# Altium PCB PWB.PcbDoc (part 1 of 5)
Units mm, origin at the board's own origin, x right, y up, seen from the top; angles counter-clockwise.
Board outline 202 x 125 mm, 2 copper layers (Top Layer, Bottom Layer), stack 1.576 mm thick; 208 components, 124 nets, 630 pads, 5440 vias.
Unrouted connection lines stored in the file: 98.
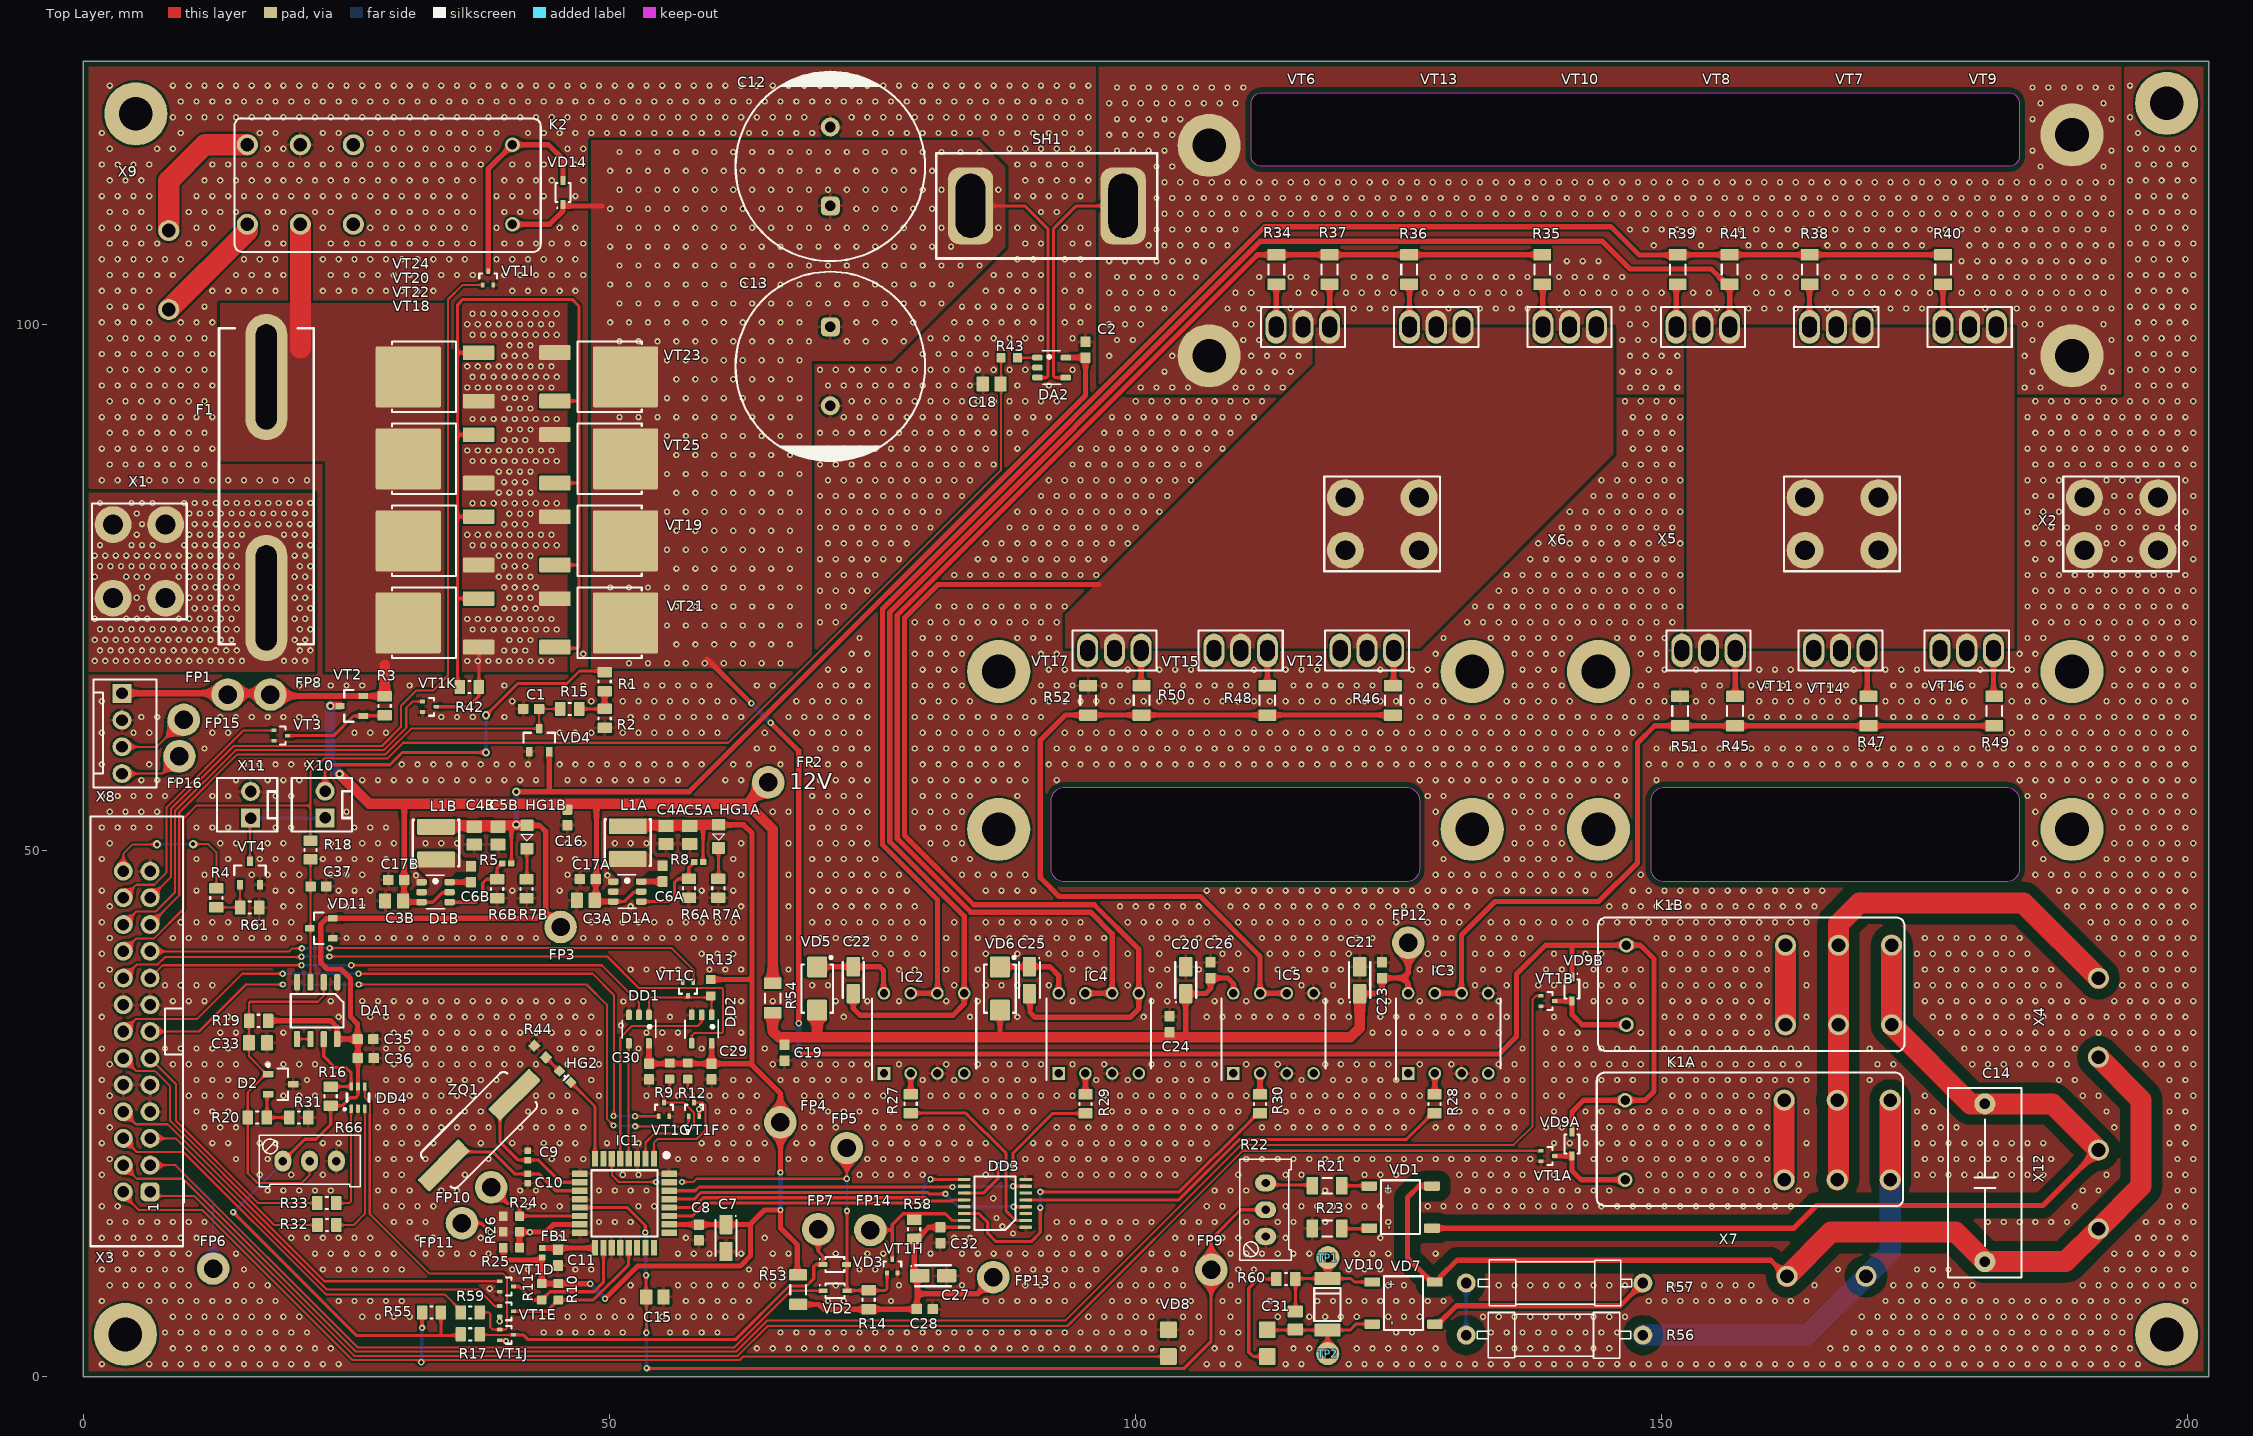
[diagram p0: Top Layer view]
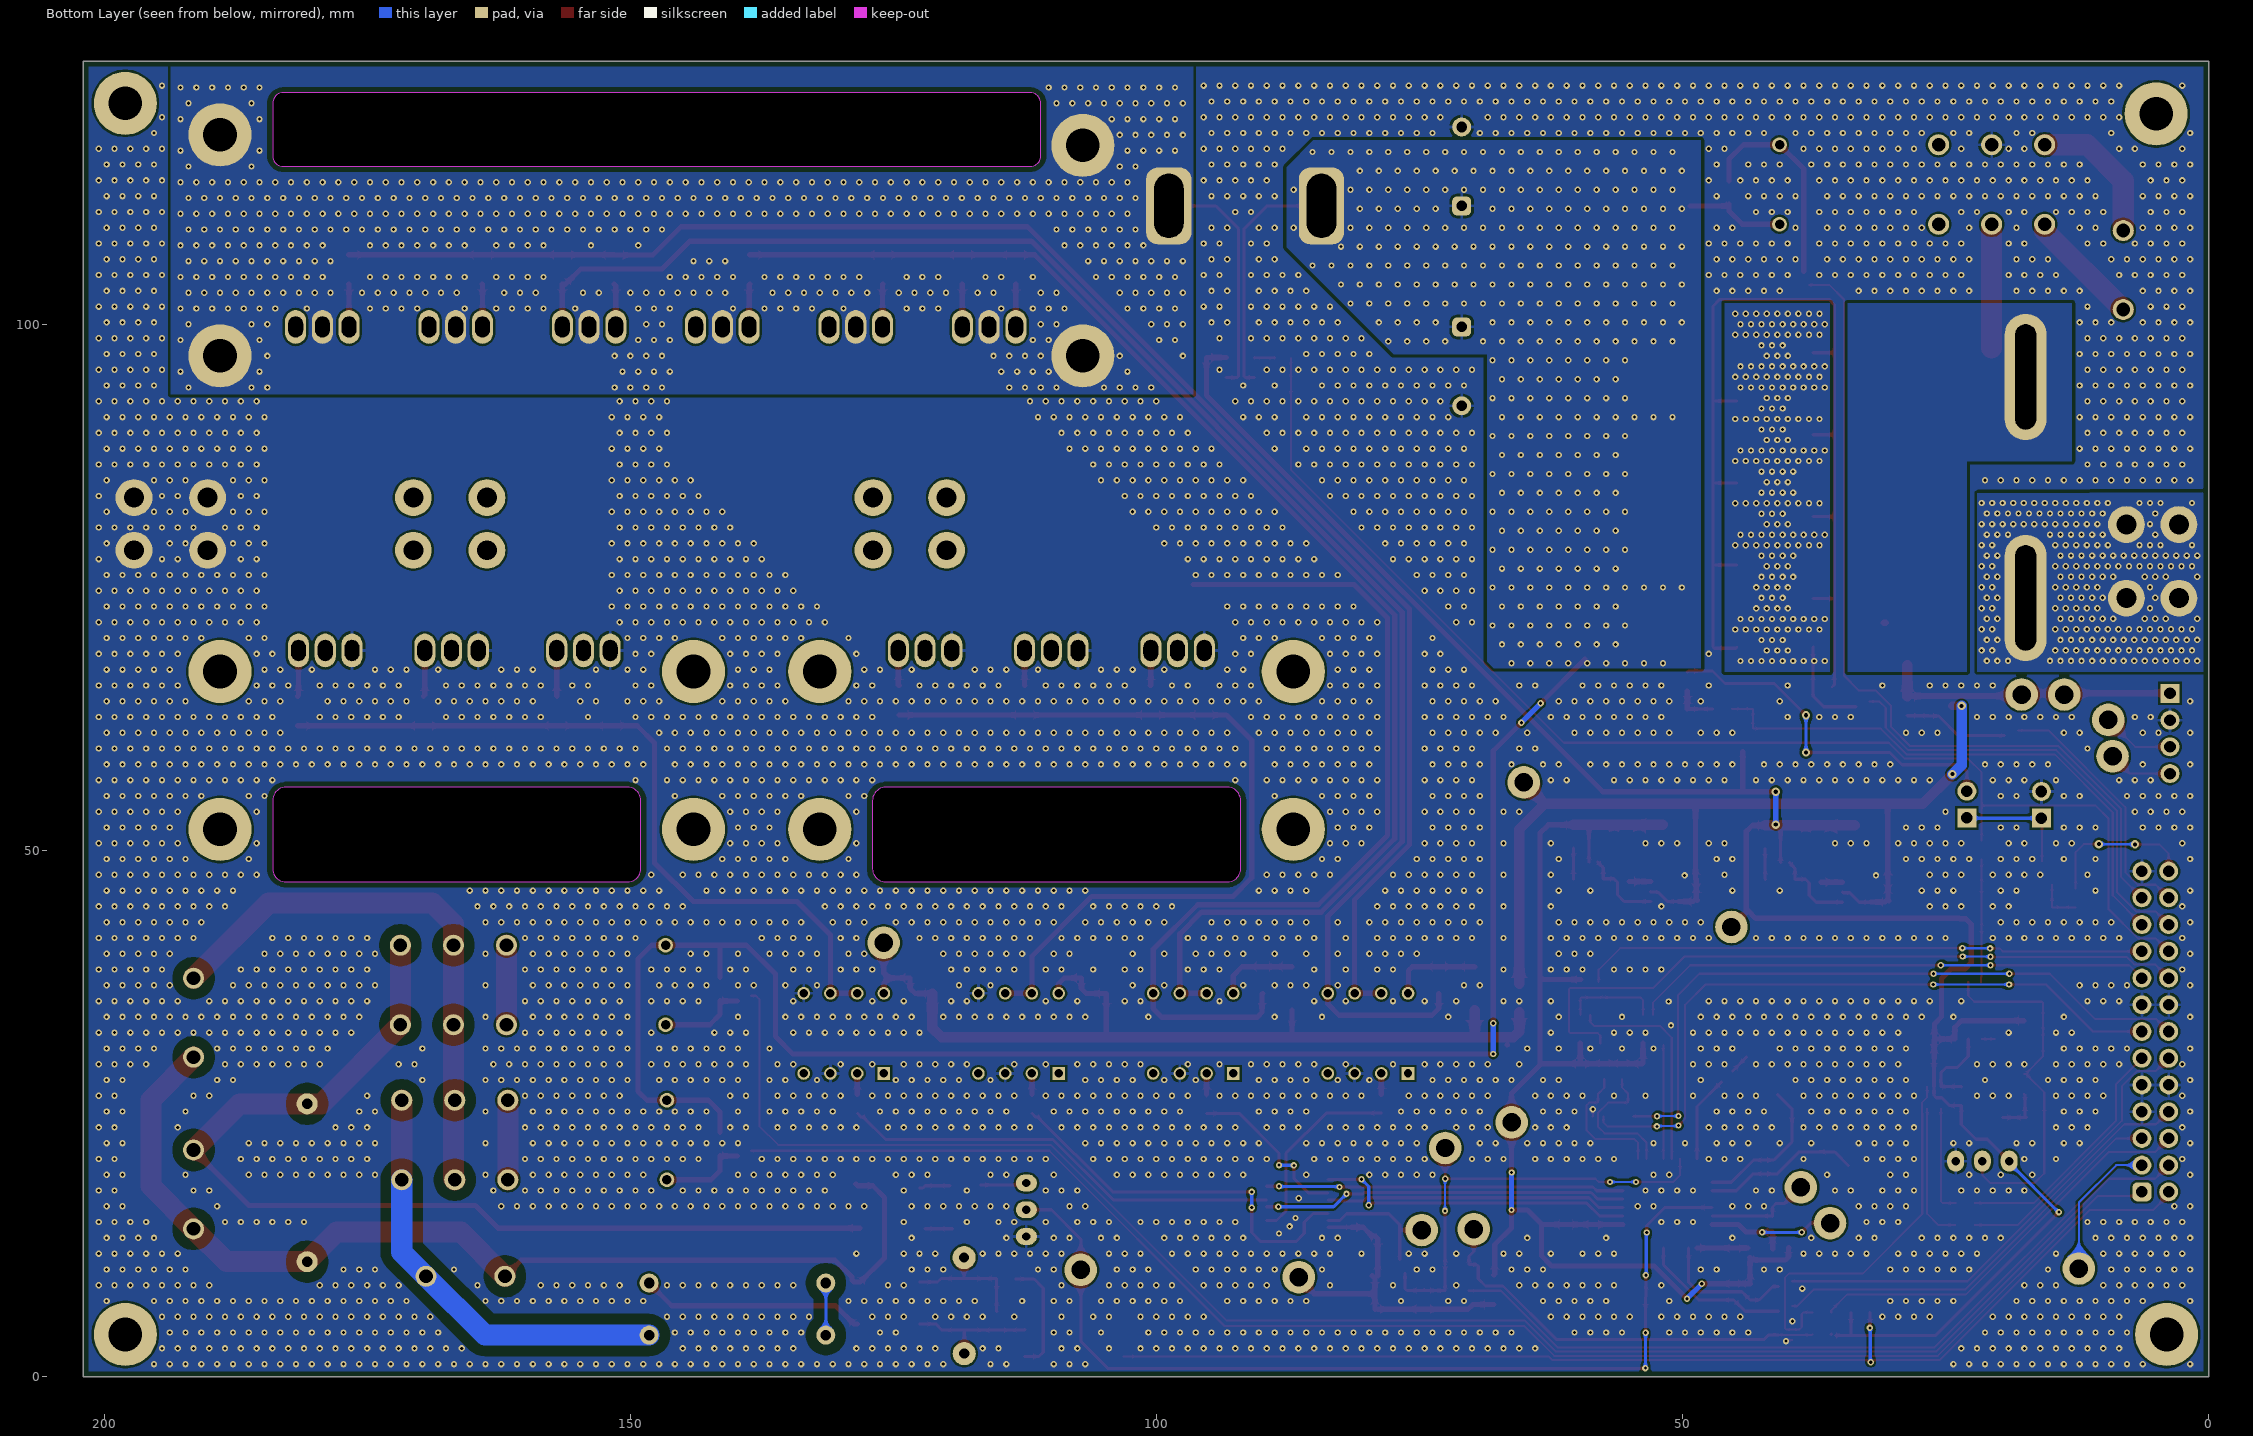
[diagram p1: Bottom Layer view, seen from below]
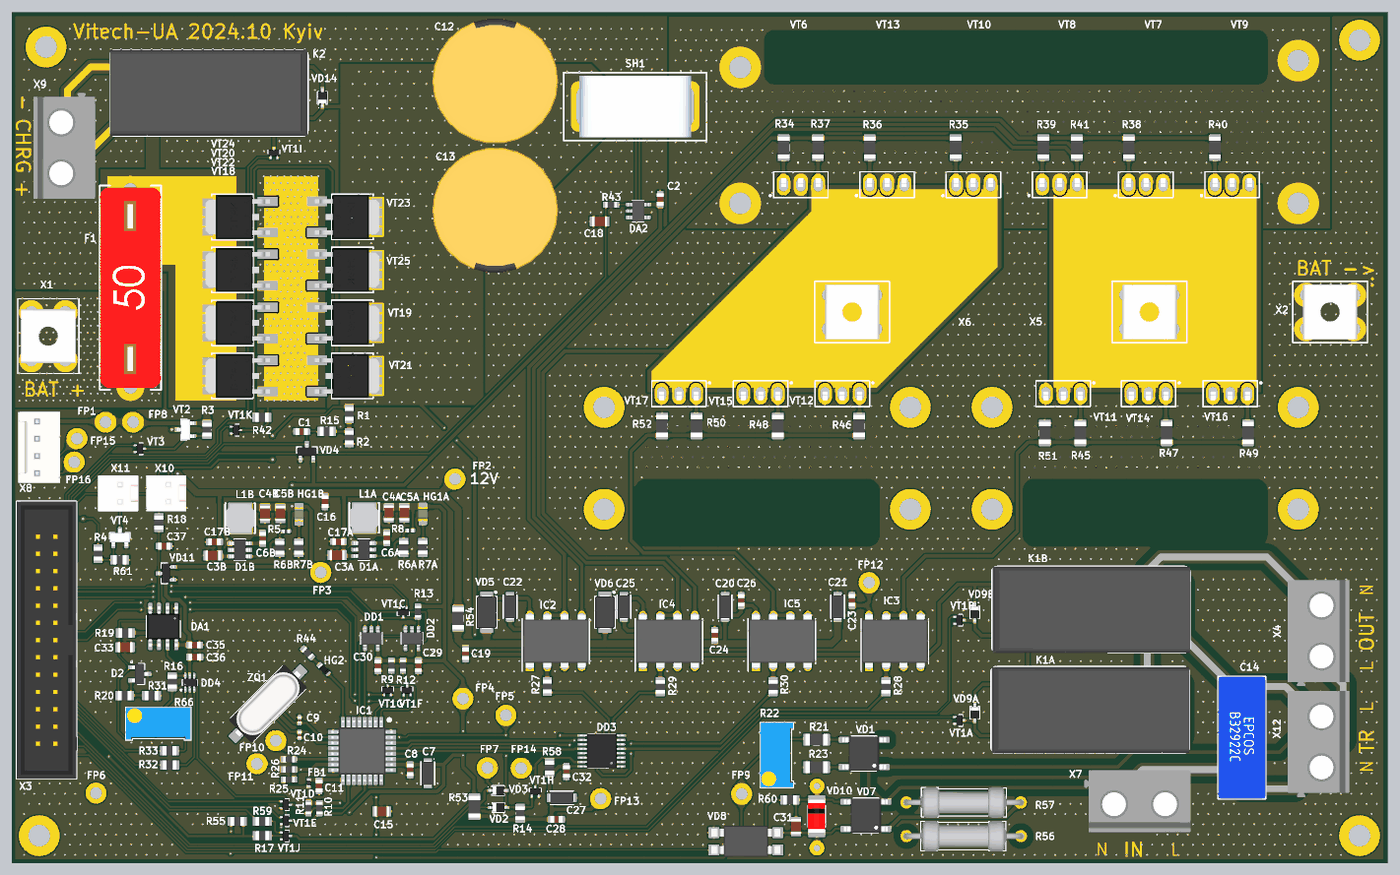
[diagram p5: 3D render of the assembled board from above, using the file's embedded part models]

## Layer stack, top to bottom
Top Solder: solder mask 0.012, Solder Resist, Dk 3.5
Top Layer: signal copper 0.038
Dielectric 1: dielectric 1.5, FR-4, Dk 4.8
Bottom Layer: signal copper 0.038
Bottom Solder: solder mask 0.012, Solder Resist, Dk 3.5

## Board outline
0,0 202,0 202,125 0,125
cut-out: 111,116 111,121 cw(c112,121) 112,122 112.27,122 183,122 cw(c183,121) 184,121 184,116 cw(c183,116) 183,115 112,115 cw(c112,116)
cut-out: 149,50.27 149,54.73 cw(c150.27,54.73) 150.27,56 182.73,56 cw(c182.73,54.73) 184,54.73 184,48.27 cw(c182.73,48.27) 182.73,47 150.27,47 cw(c150.27,48.27) 149,48.27
cut-out: 92,50.27 92,54.73 cw(c93.27,54.73) 93.27,56 125.73,56 cw(c125.73,54.73) 127,54.73 127,48.27 cw(c125.73,48.27) 125.73,47 93.27,47 cw(c93.27,48.27) 92,48.27

## Design rules (kind name [scope] priority, off if disabled: settings)
BoardOutlineClearance [All] p1: gap=0.5 ignorepadtopadclearanceinfootprint=FALSE
Clearance MiddleVoltage [InNetClass('MiddleVoltage')] p1: gap=0.5 ignorepadtopadclearanceinfootprint=FALSE except(0: Arc-Hole Track-Hole SMDPad-Hole THPad-Hole Via-Hole Fill-Hole Poly-Hole Region-Hole Text-Hole; 0.2: Arc-Text Track-Text SMDPad-Text THPad-Text Via-Text Fill-Text Poly-Text Region-Text Text-Text)
Clearance HighVoltage [InNetClass('HighVoltage')] p2: gap=1 ignorepadtopadclearanceinfootprint=FALSE except(0: Arc-Hole Track-Hole SMDPad-Hole THPad-Hole Via-Hole Fill-Hole Poly-Hole Region-Hole Text-Hole; 0.2: Arc-Text Track-Text SMDPad-Text THPad-Text Via-Text Fill-Text Poly-Text Region-Text Text-Text)
Clearance Standart [All] p3: gap=0.2 ignorepadtopadclearanceinfootprint=FALSE except(0: Arc-Hole Track-Hole SMDPad-Hole THPad-Hole Via-Hole Fill-Hole Poly-Hole Region-Hole Text-Hole; 0.3: Fill-Fill Fill-Poly Fill-Region Poly-Poly Poly-Region Region-Region)
ComponentClearance [All] p1: gap=0.1 collisioncheckmode=3 verticalgap=0.1 showdistances=TRUE
Height [All] p1: minheight=0 maxheight=40 prefheight=12.7
HoleSize [All] p1: absolutevalues=TRUE maxlimit=12 minlimit=0.3 maxpercent=80.000 minpercent=20.000
HoleToHoleClearance [All] p1: gap=0.3 allowstackedmicrovias=TRUE
MinimumSolderMaskSliver [All] p1: minsoldermaskwidth=0.1
NetAntennae [All] p1: netantennaetolerance=2
PlaneClearance [All] p1: clearance=0.3
PlaneConnect PlaneConnectMiddleCurrent [InNetClass('MiddleCurrent')] p1: planeconnectstyle=Relief reliefexpansion=0.508 reliefentries=4 reliefconductorwidth=0.5 reliefairgap=0.3
PlaneConnect PlaneHighCurrent [InNetClass('HighCurrent')] p2: planeconnectstyle=Relief reliefexpansion=0.508 reliefentries=4 reliefconductorwidth=0.5 reliefairgap=0.35
PlaneConnect [All] p3: planeconnectstyle=Relief reliefexpansion=0.508 reliefentries=4 reliefconductorwidth=0.3 reliefairgap=0.3
PolygonConnect PolygonConnectMiddleCurrent [All vs InNetClass('MiddleCurrent')] p1: connectstyle=Relief reliefconductorwidth=0.4 reliefentries=4 polygonreliefangle="90 Angle" airgapwidth=0.3
PolygonConnect PolygonHighCurrent [InNetClass('HighCurrent')] p2: connectstyle=Relief reliefconductorwidth=0.5 reliefentries=4 polygonreliefangle="90 Angle" airgapwidth=0.3
PolygonConnect PolygonConnect_Keepout [(ObjectKind = 'Track') And (Layer = 'KeepOutLayer')] p3: connectstyle=Direct reliefconductorwidth=0.254 reliefentries=4 polygonreliefangle="90 Angle" airgapwidth=0.254
PolygonConnect PolygonConnect_Via [IsVia] p4: connectstyle=Direct reliefconductorwidth=0.254 reliefentries=4 polygonreliefangle="90 Angle" airgapwidth=0.254
PolygonConnect [All] p5: thpad.connectstyle=Relief thpad.reliefconductorwidth=0.3 thpad.reliefentries=4 thpad.polygonreliefangle="90 Angle" thpad.airgapwidth=0.25 smdpad.connectstyle=Relief smdpad.reliefconductorwidth=0.3 smdpad.reliefentries=4 smdpad.polygonreliefangle="90 Angle" smdpad.airgapwidth=0.25 via.connectstyle=Direct via.reliefconductorwidth=0.3 via.reliefentries=4 via.polygonreliefangle="90 Angle" via.airgapwidth=0.3
RoomDefinition STEP_DOWNA [InComponentClass('STEP_DOWNA')] p1: confinementstyle=ConfineIn formatcopy=TRUE lockcomponents=FALSE outline 44.685,42.423 61.576,42.423 61.576,53.675 44.685,53.675
RoomDefinition STEP_DOWNB [InComponentClass('STEP_DOWNB')] p2: confinementstyle=ConfineIn formatcopy=TRUE lockcomponents=FALSE outline 26.467,42.367 43.358,42.367 43.358,53.619 26.467,53.619
RoutingCorners [All] p1: cornerstyle=45-Degree minsetback=1 maxsetback=3
RoutingVias Power [InNetClass('Power')] p1: holewidth=0.8 width=1.5 viastyle="Through Hole" minholewidth=0.5 minwidth=1 maxholewidth=1.2 maxwidth=3
RoutingVias [All] p2: holewidth=0.4 width=0.8 viastyle="Through Hole" minholewidth=0.3 minwidth=0.6 maxholewidth=0.5 maxwidth=1
SilkToSilkClearance [All] p1: silktosilkclearance=0
SilkToSolderMaskClearance [IsPad] p1: minsilkscreentomaskgap=0.05 clearancetoexposedcopper=TRUE
SolderMaskExpansion SolderMaskExpansion_VIA [IsVia] p1: expansion=-3 istentingtop=TRUE useseparateexpansions=TRUE expansionbottom=-3 istentingbottom=TRUE
SolderMaskExpansion [All] p2: expansion=0.05 istentingtop=FALSE
SupplyNets "Schematic Supply Nets_9" [InNet('+V_BRIDGE')] p1: voltage=0.000
SupplyNets "Schematic Supply Nets_8" [InNet('VCC_LOGIC')] p2: voltage=0.000
SupplyNets "Schematic Supply Nets_5" [InNet('VCC_DRV')] p3: voltage=0.000
SupplyNets "Schematic Supply Nets_4" [InNet('+VBAT')] p4: voltage=0.000
SupplyNets "Schematic Supply Nets_3" [InNet('GND')] p5: voltage=0.000
SupplyNets "Schematic Supply Nets_2" [InNet('3V3')] p6: voltage=0.000
SupplyNets "Schematic Supply Nets_1" [InNet('5V')] p7: voltage=0.000
SupplyNets "Schematic Supply Nets" [InNet('12V')] p8: voltage=0.000
Width Width_ANT [InNetClass('Anthenna')] p1: maxlimit=1.641 minlimit=0.2 preferedwidth=1.641
Width WidthMiddleCurrent [InNetClass('MiddleCurrent')] p2: maxlimit=2 minlimit=0.35 preferedwidth=0.5
Width WidthHighCurrent [InNetClass('HighCurrent')] p3: maxlimit=5 minlimit=0.5 preferedwidth=1
Width [All] p4: maxlimit=2 minlimit=0.2 preferedwidth=0.3
19 further rules are at their usual default settings.

## Classes and differential pairs
net class HighVoltage: EXT_AC_L NetK1A_5 NetR56_2 NEUTRAL TR_OUT_L
channel class RELAY: DesignatorA DesignatorB
component class OCK: VT1K
component class DesignatorB: K1B VD9B
component class DesignatorA: K1A VD9A
channel class DTC_NPN: OCA OCB OCC OCD OCE OCF OCG OCH OCI OCJ OCK
component class U_DET: C31 R55 R56 R57 R60 TP1 TP2 VD7 VD8 VD10
component class OCP: C33 C35 C36 C37 D2 DA1 DD4 R16 R17 R18 R19 R20 R31 R32 R33 R59 R66 VD11
component class OCJ: VT1J
component class OCI: VT1I
component class OCH: VT1H
component class OCG: VT1G
component class OCF: VT1F
component class OCE: VT1E
component class OCD: VT1D
component class OCC: VT1C
component class OCB: VT1B
component class OCA: VT1A
component class REVERSE_POL_PROT: R42 VT18 VT19 VT20 VT21 VT22 VT23 VT24 VT25
channel class STEP_DOWN: STEP_DOWNA STEP_DOWNB
component class STEP_DOWNB: C3B C4B C5B C6B C17B D1B HG1B L1B R6B R7B
component class STEP_DOWNA: C3A C4A C5A C6A C17A D1A HG1A L1A R6A R7A
component class PWB: C1 C2 C12 C13 C14 C16 C18 DA2 F1 FP1 FP2 FP3 FP4 FP5 FP6 FP7 FP8 FP15 FP16 K2 R1 R2 R3 R4 R5 R8 R15 R34 R35 R36 R37 R38 R39 R40 R41 R43 R45 R46 R47 R48 R49 R50 R51 R52 R61 SH1 VD2 VD3 VD4 VD14 VT2 VT3 VT4 VT6 VT7 VT8 VT9 VT10 VT11 VT12 VT13 VT14 VT15 VT16 VT17 X1 X2 X3 X4 X5 X6 X7 X8 X9 X10 X11 X12
component class GATE_DRIVER: C19 C20 C21 C22 C23 C24 C25 C26 C27 C28 C32 DD3 FP12 FP13 FP14 IC2 IC3 IC4 IC5 R14 R27 R28 R29 R30 R53 R54 R58 VD5 VD6
component class EG: C7 C8 C9 C10 C11 C15 C29 C30 DD1 DD2 FB1 FP9 FP10 FP11 HG2 IC1 R9 R10 R11 R12 R13 R21 R22 R23 R24 R25 R26 R44 VD1 ZQ1

## Components (designator, comment, footprint, x,y, rotation, side; value= is the part's Value field where it differs from the comment)
C1 "0.1uF" C_CERAMIC_0603_MED 42.57,63.449 r180 top
C2 "0.1uF" C_CERAMIC_0603_MED 95.25,97.587 r270 top
C3A "22uF" CAP-0805(2012)X125T20 47.758,45.256 r180 top (schematic designator C3)
C3B "22uF" CAP-0805(2012)X125T20 29.54,45.201 r180 top (schematic designator C3)
C4A "22uF" CAP-0805(2012)X125T20 55.378,51.454 r270 top (schematic designator C4)
C4B "22uF" CAP-0805(2012)X125T20 37.16,51.398 r270 top (schematic designator C4)
C5A "22uF" CAP-0805(2012)X125T20 57.639,51.454 r270 top (schematic designator C5)
C5B "22uF" CAP-0805(2012)X125T20 39.421,51.398 r270 top (schematic designator C5)
C6A "0.1uF" C_CERAMIC_0603_MED 55.073,47.796 r270 top (schematic designator C6)
C6B "0.1uF" C_CERAMIC_0603_MED 36.855,47.741 r270 top (schematic designator C6)
C7 "10uF" C_TANTAL_CASE_A_MED 61.087,13.157 r270 top
C8 "0.1uF" C_CERAMIC_0603_MED 58.496,13.691 r270 top
C9 "22pF" C_CERAMIC_0402_MED 42.24,21.006 r270 top
C10 "22pF" C_CERAMIC_0402_MED 42.24,18.821 r270 top
C11 "0.1uF" C_CERAMIC_0603_MED 45.11,11.303 r270 top
C12 "6800uFx25V" CAP-AE-PTH-180D05x400H20 71,115 r90 top value=6800uF
C13 "6800uFx25V" CAP-AE-PTH-180D05x400H20 71,96 r270 top value=6800uF
C14 "Film capacitor, 10μF, 450VDC, ±10%, 10.9mOhm, 31.5x15 mm, -40...+105°C" "CAP: B32922 (18x7x12.5mm)" 180.721,18.415 r270 top value=10μF
C15 "4.7uF" C_CERAMIC_0805_MED 54.331,7.569 r0 top
C16 "0.1uF" C_CERAMIC_0603_MED 45.999,53.137 r270 top
C17A "0.1uF" C_CERAMIC_0603_MED 47.958,47.263 r0 top (schematic designator C17)
C17B "0.1uF" C_CERAMIC_0603_MED 29.74,47.207 r0 top (schematic designator C17)
C18 "10nF" CAP-0805(2012)X65T10 86.335,94.336 r180 top
C19 "0.1uF" C_CERAMIC_0603_MED 66.65,30.759 r270 top
C20 "10uF" C_TANTAL_CASE_A_MED 104.775,37.668 r90 top
C21 "10uF" C_TANTAL_CASE_A_MED 121.31,37.668 r90 top
C22 "10uF" C_TANTAL_CASE_A_MED 73.177,37.668 r270 top
C23 "0.1uF" C_CERAMIC_0603_MED 123.419,38.618 r90 top
C24 "0.1uF" C_CERAMIC_0603_MED 103.251,33.477 r90 top
C25 "10uF" C_TANTAL_CASE_A_MED 89.916,37.668 r270 top
C26 "0.1uF" C_CERAMIC_0603_MED 107.137,38.618 r90 top
C27 "10uF" C_TANTAL_CASE_A_MED 80.772,9.576 r0 top
C28 "0.1uF" C_CERAMIC_0603_MED 79.985,6.401 r180 top
C29 "0.1uF" C_CERAMIC_0603_MED 59.715,28.981 r90 top
C30 "0.1uF" C_CERAMIC_0603_MED 53.772,28.981 r90 top
C31 "22uF" CAP-0805(2012)X125T20 115.189,5.334 r270 top
C32 "0.1uF" C_CERAMIC_0603_MED 81.458,13.437 r90 top
C33 "10uF" CAP-0805(2012)X125T20 16.612,31.725 r0 top
C35 "0.1uF" C_CERAMIC_0603_MED 26.822,32.055 r180 top
C36 "0.1uF" C_CERAMIC_0603_MED 26.848,30.251 r180 top
C37 "0.1uF" C_CERAMIC_0603_MED 22.352,46.584 r0 top
D1A "AP62300WU-7" SOT-23-6 51.698,46.086 r270 top (schematic designator D1)
D1B "AP62300WU-7" SOT-23-6 33.48,46.031 r270 top (schematic designator D1)
D2 "TL431ACDBZR" SOT-23_MED#1 18.771,27.788 r0 top
DA1 "LM311D" SOIC-8_W3.9MM 22.225,34.773 r180 top
DA2 "INA180A1IDBVR" SOT-23-5 92.028,95.885 r270 top
DD1 "SN74LV1T125DBVR" SOT-23-5 52.807,33.02 r180 top
DD2 "SN74LV1T125DBVR" SOT-23-5 58.776,33.02 r180 top
DD3 "SN74CB3Q3257PWR" TSSOP-16 86.639,16.459 r90 top
DD4 "SN74LVC1G175DCKR" SC-70-6 26.111,26.518 r0 top
F1 "FUSE_MAXI_50A" FUSE_MAXI_50A 17.399,74.996 r90 top
FB1 "BLM15BD601SN1D" BLM15xxxxxSN1x_MED 43.612,11.76 r90 top value="600 Ohms @ 100MHz"
FP1 "PAD-1.75mm" PAD-1.75mm 13.741,64.813 r0 top
FP2 "PAD-1.75mm" PAD-1.75mm 65.1,56.464 r0 top
FP3 "PAD-1.75mm" PAD-1.75mm 45.364,42.723 r0 top
FP4 "PAD-1.75mm" PAD-1.75mm 66.256,24.155 r0 top
FP5 "PAD-1.75mm" PAD-1.75mm 72.568,21.717 r0 top
FP6 "PAD-1.75mm" PAD-1.75mm 12.344,10.262 r0 top
FP7 "PAD-1.75mm" PAD-1.75mm 69.85,13.995 r0 top
FP8 "PAD-1.75mm" PAD-1.75mm 17.788,64.813 r0 top
FP9 "PAD-1.75mm" PAD-1.75mm 107.213,10.135 r0 top
FP10 "PAD-1.75mm" PAD-1.75mm 38.76,17.983 r0 top
FP11 "PAD-1.75mm" PAD-1.75mm 35.992,14.58 r0 top
FP12 "PAD-1.75mm" PAD-1.75mm 125.933,41.224 r0 top
FP13 "PAD-1.75mm" PAD-1.75mm 86.487,9.449 r0 top
FP14 "PAD-1.75mm" PAD-1.75mm 74.803,13.919 r0 top
FP15 "PAD-1.75mm" PAD-1.75mm 9.55,62.408 r90 top
FP16 "PAD-1.75mm" PAD-1.75mm 9.144,58.953 r90 top
HG1A "LTST-C171GKT" LTST-C171GKT 60.382,51.329 r270 top (schematic designator HG1)
HG1B "LTST-C171GKT" LTST-C171GKT 42.164,51.273 r270 top (schematic designator HG1)
HG2 "LTST-C193TGKT-5A" LTST-C193xGKT-5A 45.796,28.499 r315 top
IC1 "EG8010" QFP80P900X900X160-32N 51.435,16.459 r270 top
IC2 "TLP250" DIP762W60P254L966H485Q8N 79.908,32.614 r90 top
IC3 "TLP250" DIP762W60P254L966H485Q8N 129.718,32.614 r90 top
IC4 "TLP250" DIP762W60P254L966H485Q8N 96.512,32.614 r90 top
IC5 "TLP250" DIP762W60P254L966H485Q8N 113.115,32.614 r90 top
K1A "HF115F/012-2ZS4" HF115Fxxx-1(2)Zx3(4) 159.131,22.479 r0 top (schematic designator K1)
K1B "HF115F/012-2ZS4" HF115Fxxx-1(2)Zx3(4) 159.258,37.211 r0 top (schematic designator K1)
K2 "HF115F/012-2ZS4" HF115Fxxx-1(2)Zx3(4) 28.194,113.284 r180 top
L1A "4.7uH" SRN4018-Series_1.8mm 51.746,50.743 r90 top (schematic designator L1)
L1B "4.7uH" SRN4018-Series_1.8mm 33.528,50.688 r90 top (schematic designator L1)
R1 "10k" R_ANY_CHIP_0805_MED 49.555,66.04 r90 top
R2 "2.2k" R_ANY_CHIP_0805_MED 49.555,62.546 r270 top
R3 "10k" R_ANY_CHIP_0805_MED 28.651,63.729 r270 top
R4 "510" R_ANY_CHIP_0805_MED 12.649,45.491 r90 top
R5 "31.6k" R_ANY_CHIP_0402_MED 40.259,48.768 r0 top
R6A "10k" R_ANY_CHIP_0805_MED 57.562,46.399 r270 top (schematic designator R6)
R6B "10k" R_ANY_CHIP_0805_MED 39.345,46.344 r270 top (schematic designator R6)
R7A "510" R_ANY_CHIP_0805_MED 60.356,46.399 r270 top (schematic designator R7)
R7B "510" R_ANY_CHIP_0805_MED 42.139,46.344 r270 top (schematic designator R7)
R8 "56.2k" R_ANY_CHIP_0402_MED 58.496,48.895 r0 top
R9 "10k" R_ANY_CHIP_0603_MED 55.753,29.031 r90 top
R10 "10k" R_ANY_CHIP_0603_MED 45.161,8.052 r90 top
R11 "10k" R_ANY_CHIP_0603_MED 43.561,8.052 r90 top
R12 "10k" R_ANY_CHIP_0603_MED 57.455,29.031 r90 top
R13 "10k" R_ANY_CHIP_0603_MED 59.639,36.957 r90 top
R14 "3.3k" R_ANY_CHIP_0805_MED 74.651,7.29 r90 top
R15 "1k" R_ANY_CHIP_0805_MED 46.228,63.449 r180 top
R16 "3.3k" R_ANY_CHIP_0805_MED 23.52,26.645 r90 top
R17 "3.3k" R_ANY_CHIP_0805_MED 36.779,4.013 r0 top
R18 "10.2k" R_ANY_CHIP_0805_MED 21.59,50.038 r90 top
R19 "100" R_ANY_CHIP_0805_MED 16.662,33.807 r180 top
R20 "510" R_ANY_CHIP_0805_MED 16.535,24.613 r0 top
R21 "100k" R_ANY_CHIP_1206_MED 118.212,18.136 r0 top
R22 "10k" 3296W-1-xxx 112.37,15.85 r0 top
R23 "100k" R_ANY_CHIP_1206_MED 118.212,14.072 r0 top
R24 "0" R_ANY_CHIP_0603_MED 40.691,15.24 r180 top
R25 "0" R_ANY_CHIP_0603_MED 40.691,12.243 r180 top
R26 "NC" R_ANY_CHIP_0603_MED 40.691,13.741 r180 top
R27 "510" R_ANY_CHIP_0805_MED 78.638,25.933 r90 top
R28 "510" R_ANY_CHIP_0805_MED 128.422,25.908 r90 top
R29 "510" R_ANY_CHIP_0805_MED 95.25,25.908 r90 top
R30 "510" R_ANY_CHIP_0805_MED 111.836,25.908 r90 top
R31 "3.3k" R_ANY_CHIP_0805_MED 20.498,24.613 r0 top
R32 "100" R_ANY_CHIP_0805_MED 23.165,14.402 r180 top
R33 "100" R_ANY_CHIP_0805_MED 23.139,16.485 r180 top
R34 "4.7" R_ANY_CHIP_1206_MED 113.386,105.207 r270 top
R35 "4.7" R_ANY_CHIP_1206_MED 138.659,105.207 r270 top
R36 "4.7" R_ANY_CHIP_1206_MED 126.009,105.207 r270 top
R37 "10k" R_ANY_CHIP_1206_MED 118.44,105.207 r90 top
R38 "4.7" R_ANY_CHIP_1206_MED 164.084,105.207 r270 top
R39 "4.7" R_ANY_CHIP_1206_MED 151.536,105.207 r270 top
R40 "4.7" R_ANY_CHIP_1206_MED 176.759,105.207 r270 top
R41 "10k" R_ANY_CHIP_1206_MED 156.464,105.207 r90 top
R42 "1k" R_ANY_CHIP_0805_MED 36.703,65.532 r180 top
R43 "10k" R_ANY_CHIP_0603_MED 88.011,96.799 r180 top
R44 "1k" R_ANY_CHIP_0603_MED 43.409,30.886 r315 top
R45 "4.7" R_ANY_CHIP_1206_MED 156.972,63.246 r90 top
R46 "4.7" R_ANY_CHIP_1206_MED 124.46,64.262 r90 top
R47 "4.7" R_ANY_CHIP_1206_MED 169.672,63.246 r90 top
R48 "4.7" R_ANY_CHIP_1206_MED 112.522,64.262 r90 top
R49 "4.7" R_ANY_CHIP_1206_MED 181.61,63.246 r90 top
R50 "4.7" R_ANY_CHIP_1206_MED 100.584,64.262 r90 top
R51 "10k" R_ANY_CHIP_1206_MED 151.765,63.246 r270 top
R52 "10k" R_ANY_CHIP_1206_MED 95.504,64.262 r270 top
R53 "0" R_ANY_CHIP_1206_MED 67.945,8.255 r90 top
R54 "0" R_ANY_CHIP_1206_MED 65.532,35.966 r90 top
R55 "10.2k" R_ANY_CHIP_0805_MED 33.096,6.096 r180 top
R56 "150k" MOR200S-Series 139.827,3.937 r180 top
R57 "150k" MOR200S-Series 139.827,8.89 r0 top
R58 "10k" R_ANY_CHIP_0805_MED 78.969,13.995 r270 top
R59 "100" R_ANY_CHIP_0805_MED 36.779,6.096 r180 top
R60 "120" R_ANY_CHIP_0805_MED 114.3,9.271 r180 top
R61 "10k" R_ANY_CHIP_0805_MED 15.819,44.564 r180 top
R66 "NC" 3296W-1-xxx 21.514,20.472 r270 top
SH1 "CG FL-U Model 60A" "CG FL-U Model 60A" 84.078,111.252 r0 top
TP1 "PAD-0.96mm" PAD-0.96mm 118.288,11.303 r0 top
TP2 "PAD-0.96mm" PAD-0.96mm 118.273,2.181 r90 top
VD1 "ABS6H" ABSxx-Series 125.197,16.104 r90 top
VD2 "BAT60JFILM" SOD-323_MED 71.45,8.153 r0 top
VD3 "BAT60JFILM" SOD-323_MED 71.425,10.643 r0 top
VD4 "BAV199-7-F" SOT-23_MED#2 43.332,60.477 r270 top
VD5 "US1M" SMA_MED 69.748,36.868 r270 top
VD6 "US1M" SMA_MED 87.122,36.868 r270 top
VD7 "ABS6H" ABSxx-Series 125.476,6.985 r90 top
VD8 "EL817S1(B)(TU)-F" EL-817S1-(x)(xx) 107.823,3.175 r90 top
VD9A "1N4148WS" SOD-323_MED 141.478,22.098 r270 top (schematic designator VD9)
VD9B "1N4148WS" SOD-323_MED 141.478,36.83 r270 top (schematic designator VD9)
VD10 "ZM4757A-GS08" DO-213AB 118.237,6.858 r270 top
VD11 "BAV199-7-F" SOT-23_MED#2 22.631,42.596 r0 top
VD14 "1N4148WS" SOD-323_MED 45.593,112.522 r90 top
VT1A "DTC143ZET1G" SOT-416 139.192,20.955 r270 top (schematic designator VT1)
VT1B "DTC143ZET1G" SOT-416 139.192,35.687 r270 top (schematic designator VT1)
VT1C "DTC143ZET1G" SOT-416 57.48,36.83 r180 top (schematic designator VT1)
VT1D "DTC143ZET1G" SOT-416 40.234,8.56 r270 top (schematic designator VT1)
VT1E "DTC143ZET1G" SOT-416 40.234,6.198 r270 top (schematic designator VT1)
VT1F "DTC143ZET1G" SOT-416 58.039,25.375 r0 top (schematic designator VT1)
VT1G "DTC143ZET1G" SOT-416 55.194,25.375 r0 top (schematic designator VT1)
VT1H "DTC143ZET1G" SOT-416 76.886,10.49 r0 top (schematic designator VT1)
VT1I "DTC143ZET1G" SOT-416 38.481,104.394 r0 top (schematic designator VT1)
VT1J "DTC143ZET1G" SOT-416 40.234,3.962 r270 top (schematic designator VT1)
VT1K "DTC143ZET1G" SOT-416 32.893,63.652 r270 top (schematic designator VT1)
VT2 "IRLML9301TRPbF" SOT-23_MED#3 25.502,63.729 r0 top
VT3 "DTC143ZET1G" SOT-416 18.771,60.909 r270 top
VT4 "IRLML6344" SOT-23_MED#3 15.85,47.854 r270 top
VT6 "MOSFET N-channel transistor, 80V, 7A, 9.1nC, 2.5W, 34mOhm, 756pF, 8-TDSON, -55...+150°C" TO220(H) 115.912,99.746 r0 top
VT7 "MOSFET N-channel transistor, 80V, 7A, 9.1nC, 2.5W, 34mOhm, 756pF, 8-TDSON, -55...+150°C" TO220(H) 166.6,99.746 r0 top
VT8 "MOSFET N-channel transistor, 80V, 7A, 9.1nC, 2.5W, 34mOhm, 756pF, 8-TDSON, -55...+150°C" TO220(H) 153.928,99.746 r0 top
VT9 "MOSFET N-channel transistor, 80V, 7A, 9.1nC, 2.5W, 34mOhm, 756pF, 8-TDSON, -55...+150°C" TO220(H) 179.272,99.746 r0 top
VT10 "MOSFET N-channel transistor, 80V, 7A, 9.1nC, 2.5W, 34mOhm, 756pF, 8-TDSON, -55...+150°C" TO220(H) 141.256,99.746 r0 top
VT11 "MOSFET N-channel transistor, 80V, 7A, 9.1nC, 2.5W, 34mOhm, 756pF, 8-TDSON, -55...+150°C" TO220(H) 154.46,69 r180 top
VT12 "MOSFET N-channel transistor, 80V, 7A, 9.1nC, 2.5W, 34mOhm, 756pF, 8-TDSON, -55...+150°C" TO220(H) 122,69 r180 top
VT13 "MOSFET N-channel transistor, 80V, 7A, 9.1nC, 2.5W, 34mOhm, 756pF, 8-TDSON, -55...+150°C" TO220(H) 128.584,99.746 r0 top
VT14 "MOSFET N-channel transistor, 80V, 7A, 9.1nC, 2.5W, 34mOhm, 756pF, 8-TDSON, -55...+150°C" TO220(H) 167,69 r180 top
VT15 "MOSFET N-channel transistor, 80V, 7A, 9.1nC, 2.5W, 34mOhm, 756pF, 8-TDSON, -55...+150°C" TO220(H) 110,69 r180 top
VT16 "MOSFET N-channel transistor, 80V, 7A, 9.1nC, 2.5W, 34mOhm, 756pF, 8-TDSON, -55...+150°C" TO220(H) 179,69 r180 top
VT17 "MOSFET N-channel transistor, 80V, 7A, 9.1nC, 2.5W, 34mOhm, 756pF, 8-TDSON, -55...+150°C" TO220(H) 98,69 r180 top
VT18 "DMP4051LK3-13" DPAK_REC 32.385,87.207 r90 top
VT19 "DMP4051LK3-13" DPAK_REC 50.031,79.422 r270 top
VT20 "DMP4051LK3-13" DPAK_REC 32.385,94.996 r90 top
VT21 "DMP4051LK3-13" DPAK_REC 50.031,71.628 r270 top
VT22 "DMP4051LK3-13" DPAK_REC 32.385,71.628 r90 top
VT23 "DMP4051LK3-13" DPAK_REC 50.031,95.01 r270 top
VT24 "DMP4051LK3-13" DPAK_REC 32.385,79.417 r90 top
VT25 "DMP4051LK3-13" DPAK_REC 50.031,87.216 r270 top
X1 "Power connector, *, *" "CON: 8191" 5.334,77.47 r180 top
X2 "Power connector, *, *" "CON: 8191" 193.675,81.026 r270 top
X3 "DS1013-26SSIB1-3A" BH-26 5.08,32.791 r90 top
X4 "DG300-7.5-02P" DG300-7.5-02P-11-00AH_REC 191.516,34.103 r90 top
X5 "Power connector, *, *" "CON: 8191" 167.132,81.026 r90 top
X6 "Power connector, *, *" "CON: 8191" 123.444,81.026 r90 top
X7 "DG300-7.5-02P" DG300-7.5-02P-11-00AH_REC 165.675,9.525 r0 top
X8 "WH-04S" WF-4S 3.683,61.112 r270 top
X9 "DG300-7.5-02P" DG300-7.5-02P-11-00AH_REC 8.128,105.156 r270 top
X10 "WH-02S" WF-2S 22.987,53.086 r90 top
X11 "WH-02S" WF-2S 15.9,53.061 r90 top
X12 "DG300-7.5-02P" DG300-7.5-02P-11-00AH_REC 191.516,17.78 r90 top
ZQ1 "CSM4Z-A2B3C3-40-12.0D18" CSM4-Series 37.617,23.419 r45 top

## Footprints (in the part's own frame and the unit in brackets; to place one, negate y for a bottom-side part, rotate by r counter-clockwise, add the part's x,y. Pads: shape width x height; smd on the part's side, far side on the other; paste and mask are expansions set on the pad)
3296W-1-xxx [mm] "Square Trimpot Trimming Potentiometer"
  oval 2x1.6 hole 0.8 mask+0.05: 1(0,-2.54) 2(0,0) 3(0,2.54)
  silkscreen extent -2.45,-4.8 2.45,4.8, body extent -2.45,-4.76 2.38,4.76, height 11.6
ABSxx-Series [mm] "SOP, 4-Leads, Body 5.00x4.40mm, Pitch 4.00mm, IPC Medium Density"
  rrect25% 0.9x1.5 smd: 1(-2,-2.975) 2(2,-2.975) 3(2,2.975) 4(-2,2.975)
  silkscreen extent -2.55,-1.85 2.55,1.85, body extent -2.55,-3.22 2.55,3.23, height 1.6
BH-26 [mm]
  rrect50% 1.8x1.8 hole 1.1: 1(-15.24,-1.27)
  round 1.8 hole 1.1: 2(-15.24,1.27) 3(-12.7,-1.27) 4(-12.7,1.27) 5(-10.16,-1.27) 6(-10.16,1.27) 7(-7.62,-1.27) 8(-7.62,1.27) 9(-5.08,-1.27) 10(-5.08,1.27) 11(-2.54,-1.27) 12(-2.54,1.27) 13(0,-1.27) 14(0,1.27) 15(2.54,-1.27) 16(2.54,1.27) 17(5.08,-1.27) 18(5.08,1.27) 19(7.62,-1.27) 20(7.62,1.27) 21(10.16,-1.27) 22(10.16,1.27) 23(12.7,-1.27) 24(12.7,1.27) 25(15.24,-1.27) 26(15.24,1.27)
  silkscreen extent -20.41,-4.5 20.41,4.4, body extent -20.44,-4.5 20.38,4.4, height 9
BLM15xxxxxSN1x_MED [mm] "Chip Inductor, 2-Leads, Body 1,00x0,50mm, IPC Medium Density"
  rrect15% 0.59x0.62 smd mask+0.05: 1(-0.455,0) 2(0.455,0)
  body extent -0.52,-0.27 0.53,0.28, height 0.55
C_CERAMIC_0402_MED [mm] "Chip Capacitor, 2-Leads, Body 1,00x0,50mm, IPC Medium Density"
  rrect15% 0.62x0.62 smd mask+0.05: 1(-0.44,0) 2(0.44,0)
  body extent -0.52,-0.27 0.53,0.28, height 0.55
C_CERAMIC_0603_MED [mm] "Chip Capacitor, 2-Leads, Body 1,60x0,80mm, IPC Medium Density"
  rrect15% 1x0.95 smd mask+0.05: 1(-0.75,0) 2(0.75,0)
  Top Layer pour cut-out: -0.05,0.45 0.05,0.45 0.05,-0.45 -0.05,-0.45
  body extent -0.9,-0.5 0.9,0.5, height 0.9
C_CERAMIC_0805_MED [mm] "Chip Capacitor, 2-Leads, Body 2,00x1,25mm, IPC Medium Density"
  rrect15% 1.15x1.45 smd mask+0.05: 1(-0.825,0) 2(0.825,0)
  Top Layer pour cut-out: -0.05,0.65 0.05,0.65 0.05,-0.65 -0.05,-0.65
  body extent -1.1,-0.72 1.1,0.73, height 1.35
C_TANTAL_CASE_A_MED [mm] "Molded Capacitor, 2-Leads, Body 3,20x1,60mm, IPC Medium Density"
  rrect15% 1.85x1.25 smd: 1(-1.275,0) 2(1.275,0)
  silkscreen extent -2.15,-1 1.7,1, body extent -1.92,-0.9 1.92,0.9, height 1.8
CAP-0805(2012)X65T10 [mm] "Chip Capacitor, 2-Leads, Body 2,00x1,25mm, IPC Medium Density"
  rrect15% 1.15x1.45 smd mask+0.05: 1(-0.85,0) 2(0.85,0)
  Top Layer pour cut-out: -0.05,0.651 0.05,0.651 0.05,-0.649 -0.05,-0.649
  body extent -1.1,-0.72 1.1,0.73, height 0.75
CAP-0805(2012)X125T20 [mm] "Chip Capacitor, 2-Leads, Body 2,00x1,25mm, IPC Medium Density"
  rrect15% 1.15x1.45 smd mask+0.05: 1(-0.85,0) 2(0.85,0)
  Top Layer pour cut-out: -0.05,0.651 0.05,0.651 0.05,-0.649 -0.05,-0.649
  body extent -1.1,-0.72 1.1,0.73, height 1.45
CAP-AE-PTH-180D05x400H20 [mm] "PTH Aluminium Electrolytic Capacitor, Diameter 18mm, Height 40mm"
  rrect50% 1.8x1.8 hole 1: 1(-3.75,0)
  round 1.8 hole 1: 2(3.75,0)
  silkscreen extent -9,-9 9,9, body extent -9.25,-9.25 9.25,9.25, height 42.05
"CAP: B32922 (18x7x12.5mm)" [mm]
  round 2 hole 1 mask+0.075: 1(-7.5,0) 2(7.5,0)
  silkscreen extent -9,-3.5 9,3.5, body extent -9,-3.5 9,3.5, height 12.5
"CG FL-U Model 60A" [mm]
  rrect50% 4.3x7.3 hole 2.8 slot 6.1 at 90 deg: 1(0.25,0) 2(14.75,0)
  silkscreen extent -3,-5 18,5, body extent -0.7,-4.5 15.7,4.5, height 2.2
"CON: 8191" [mm]
  round 3.5 hole 1.9: 1(-2.5,3.5) 1(-2.5,-3.5) 1(2.5,3.5) 1(2.5,-3.5)
  silkscreen extent -4.5,-5.5 4.5,5.5, body extent -4,-4 4,4, height 7.05
CSM4-Series [mm] "Low Profile Surface Mount Crystals, Max Height 3.5mm"
  rrect15% 5.5x1.6 smd: 1(-4.75,0) 2(4.75,0)
  silkscreen extent -5.7,-2.4 5.7,2.4, body extent -6.4,-2.41 6.4,2.42, height 3.5
DG300-7.5-02P-11-00AH_REC [mm] "Screw terminal"
  round 2 hole 1.3: 1(-3.75,0) 2(3.75,0)
  body extent -8.1,-5 7.5,4.1, height 12.6
DIP762W60P254L966H485Q8N [mm]
  rect 1.2x1.2 hole 0.8: 1(-3.81,3.81)
  round 1.2 hole 0.8: 2(-3.81,1.27) 3(-3.81,-1.27) 4(-3.81,-3.81) 5(3.81,-3.81) 6(3.81,-1.27) 7(3.81,1.27) 8(3.81,3.81)
  silkscreen extent -4.41,-4.95 3.32,4.95, body extent -3.96,-4.83 3.96,4.83, height 4.85
DO-213AB [mm]
  rrect15% 1.25x2.5 smd mask+0.05: AN(2.45,0.005) CA(-2.45,0.005)
  silkscreen extent -1.57,-1.25 1.58,1.25, body extent -2.4,-1.33 2.4,1.27, height 2.6
DPAK_REC [mm]
  rrect15% 1.4x3 smd mask+0.05: 1(-2.3,-5.2) 3(2.3,-5.2)
  rrect5% 5.8x6.2 smd paste-3.1 mask+0.05: 2(0,1.5)
  silkscreen extent -3.35,-3.05 3.35,3.05, body extent -3.25,-5.55 3.25,3.95, height 2.3
EL-817S1-(x)(xx) [mm] "SMD Optocoupler 5kV"
  rrect15% 1.6x1.6 smd mask+0.05: 1(-1.27,-4.7) 2(1.27,-4.7) 3(1.27,4.7) 4(-1.27,4.7)
  body extent -2.31,-5.09 2.29,5.07, height 3.76
FUSE_MAXI_50A [mm]
  oval 12x4 hole 2 slot 10 at 0 deg: 1(-1,0) 2(20,0)
  silkscreen extent -5.41,-4.5 24.62,4.5, body extent -5.13,-4.5 24.37,4.5, height 28.06
HF115Fxxx-1(2)Zx3(4) [mm] "Miniature High Power Relay"
  round 1.4 hole 0.9: 1(-12.6,3.78) 2(-12.6,-3.78)
  round 2 hole 1.3: 3(2.52,3.78) 4(2.52,-3.78) 5(7.56,3.78) 6(7.56,-3.78) 7(12.6,3.78) 8(12.6,-3.78)
  silkscreen extent -15.29,-6.3 13.82,6.41, body extent -15.17,-6.35 13.83,6.35, height 15.7
LTST-C171GKT [mm]
  rrect15% 1.1x1.25 smd mask+0.05: AN(-1.1,0) CA(1.1,0)
  silkscreen extent -0.25,-0.6 0.35,0.6, body extent -1.05,-0.67 1.05,0.68, height 0.9
LTST-C193xGKT-5A [mm] "SMD 0603 Indication LED, Green, Lens Clear"
  rrect15% 0.8x0.8 smd: AN(0.75,0) CA(-0.75,0)
  silkscreen extent -0.15,-0.4 0.2,0.4, body extent -0.79,-0.4 0.8,0.4, height 0.35
MOR200S-Series [mm] "d4mm L11mm Axial Through Hole Resistor"
  round 1.8 hole 1 mask+0.05: 1(-8.4,0) 2(8.4,0)
  silkscreen extent -7.25,-2.15 7.35,2.2, body extent -8.76,-2.25 8.76,2.25, height 4.75
PAD-0.96mm [mm]
  round 2.2 hole 0.96: 1(0,0)
PAD-1.75mm [mm]
  round 3.1 hole 1.75: 1(0,0)
QFP80P900X900X160-32N [mm]
  rect 1.475x0.6 smd: 1(-4.238,2.8) 2(-4.238,2) 3(-4.238,1.2) 4(-4.238,0.4) 5(-4.238,-0.4) 6(-4.238,-1.2) 7(-4.238,-2) 8(-4.238,-2.8) 17(4.238,-2.8) 18(4.238,-2) 19(4.238,-1.2) 20(4.238,-0.4) 21(4.238,0.4) 22(4.238,1.2) 23(4.238,2) 24(4.238,2.8)
  rect 0.6x1.475 smd: 9(-2.8,-4.238) 10(-2,-4.238) 11(-1.2,-4.238) 12(-0.4,-4.238) 13(0.4,-4.238) 14(1.2,-4.238) 15(2,-4.238) 16(2.8,-4.238) 25(2.8,4.238) 26(2,4.238) 27(1.2,4.238) 28(0.4,4.238) 29(-0.4,4.238) 30(-1.2,4.238) 31(-2,4.238) 32(-2.8,4.238)
  silkscreen extent -4.77,-3.15 3.15,4.2, body extent -4.5,-4.5 4.5,4.5, height 1.6
R_ANY_CHIP_0402_MED [mm] "Chip Resistor, 2-Leads, Body 1,00x0,50mm, IPC Medium Density"
  rrect15% 0.6x0.55 smd mask+0.05: 1(-0.425,0) 2(0.425,0)
  body extent -0.52,-0.27 0.53,0.28, height 0.4
R_ANY_CHIP_0603_MED [mm] "Chip Resistor, 2-Leads, Body 1,60x0,80mm, IPC Medium Density"
  rrect15% 0.85x0.9 smd mask+0.05: 1(-0.775,0) 2(0.775,0)
  body extent -0.85,-0.45 0.85,0.45, height 0.55
R_ANY_CHIP_0805_MED [mm] "Chip Resistor, 2-Leads, Body 2,00x1,25mm, IPC Medium Density"
  rrect15% 1x1.35 smd: 1(-0.9,0) 2(0.9,0)
  silkscreen extent -0.1,-0.57 0.1,0.58, body extent -1,-0.67 1,0.68, height 0.6
R_ANY_CHIP_1206_MED [mm] "Chip Resistor, 2-Leads, Body 3,10x1,60mm, IPC Medium Density"
  rrect15% 1.1x1.7 smd: 1(-1.4,0) 2(1.4,0)
  silkscreen extent -0.45,-0.75 0.45,0.75, body extent -1.6,-0.85 1.6,0.85, height 0.65
SC-70-6 [mm]
  rrect50% 0.35x0.8 smd paste+0 mask+0.05: 1(-0.65,-1.05) 2(0,-1.05) 3(0.65,-1.05) 4(0.65,1.05) 5(0,1.05) 6(-0.65,1.05)
  silkscreen extent -1.35,-1.19 1.05,0.39, body extent -1.05,-1.15 1.05,1.15, height 1
SMA_MED [mm] "Molded Diode, 2-Leads, Body 4,30x2,61mm, IPC Medium Density"
  rrect15% 2x1.9 smd: AN(2.05,0) CA(-2.05,0)
  silkscreen extent -3.07,-1.5 2.3,1.5, body extent -2.52,-1.46 2.52,1.46, height 2.44
SOD-323_MED [mm] "SOD-323, 2-Leads, Body 1,25x2,50mm, IPC Medium Density"
  rrect15% 0.85x0.45 smd paste+0 mask+0.05: AN(1.125,0) CA(-1.125,0)
  silkscreen extent -1.5,-0.7 0.9,0.7, body extent -1.3,-0.67 1.3,0.68, height 1.1
SOIC-8_W3.9MM [mm]
  rrect50% 0.6x1.55 smd mask+0.05: 1(-1.905,-2.7) 2(-0.635,-2.7) 3(0.635,-2.7) 4(1.905,-2.7) 5(1.905,2.7) 6(0.635,2.7) 7(-0.635,2.7) 8(-1.905,2.7)
  silkscreen extent -2.5,-1.6 2.5,1.6, body extent -2.45,-3 2.45,3, height 1.7
SOT-23-5 [mm] "SOT23, 5-Leads, Body 2,80x1,60mm, Pitch 0,95mm, IPC Medium Density"
  rrect50% 0.55x1 smd mask+0.05: 1(-0.95,-1.35) 2(0,-1.35) 3(0.95,-1.35) 4(0.95,1.35) 5(-0.95,1.35)
  silkscreen extent -1.59,-0.88 1.59,0.86, body extent -1.55,-1.6 1.55,1.6, height 1.45
SOT-23-6 [mm]
  rrect50% 0.6x1 smd mask+0.05: 1(-0.95,-1.33) 2(0,-1.33) 3(0.95,-1.33) 4(0.95,1.33) 5(0,1.33) 6(-0.95,1.33)
  silkscreen extent -1.59,-0.88 1.59,0.86, body extent -1.52,-1.5 1.52,1.5, height 1.25
SOT-23_MED#1 [mm] "SOT23, 3-Leads, Body 2,92x2,37mm, Pitch 0,95mm, IPC Medium Density"
  rrect15% 1x0.6 smd: 1(-1.2,0.95) 2(-1.2,-0.95) 3(1.2,0)
  silkscreen extent -1.32,-1.5 0.7,1.92, body extent -1.32,-1.52 1.32,1.52, height 1.12
SOT-23_MED#2 [mm] "SOT23, 3-Leads, Body 2,92x2,37mm, Pitch 0,95mm, IPC Medium Density"
  rrect15% 0.9x0.6 smd: 1(1.1,-0.95) 2(1.1,0.95) 3(-1.1,0)
  silkscreen extent -0.7,-1.5 0.2,1.5, body extent -1.17,-1.46 1.17,1.46, height 1
SOT-23_MED#3 [mm] "SOT23, 3-Leads, Body 2,92x2,37mm, Pitch 0,95mm, IPC Medium Density"
  rrect15% 0.9x0.6 smd mask+0.05: 1(1.1,-0.95) 2(1.1,0.95) 3(-1.1,0)
  silkscreen extent -0.7,-1.5 0.2,1.5, body extent -1.27,-1.5 1.28,1.5, height 1.15
SOT-416 [mm]
  rrect15% 0.35x0.5 smd mask+0.05: 1(-0.5,-0.65) 2(0.5,-0.65) 3(0,0.65)
  silkscreen extent -0.85,-0.05 0.85,0.45, body extent -0.8,-0.8 0.8,0.8, height 0.78
SRN4018-Series_1.8mm [mm] "Semi-shielded Power Inductors, 4.0x4.0x1.8mm"
  rrect15% 1.5x3.6 smd mask+0.05: 1(-1.55,0) 2(1.55,0)
  silkscreen extent -2.2,-2.2 2.2,2.2, body extent -2.1,-2.1 2.1,2.1, height 1.8
TO220(H) [mm]
  oval 2x3.2 hole 1.4 slot 2 at 90 deg: 1(-2.54,0) 2(0,0) 3(2.54,0)
  round 0.5 on Top Overlay: ""(-4.5,-1.6)
  round 0.5 on Mech1: ""(-3.5,-1.4)
  silkscreen extent -4,-1.9 4,1.9, body extent -4.95,-0.37 4.95,20.67, height 2.76
TSSOP-16 [mm]
  rrect50% 0.3x1.2 smd mask+0.05: 1(-2.275,-2.925) 2(-1.625,-2.925) 3(-0.975,-2.925) 4(-0.325,-2.925) 5(0.325,-2.925) 6(0.975,-2.925) 7(1.625,-2.925) 8(2.275,-2.925) 9(2.275,2.925) 10(1.625,2.925) 11(0.975,2.925) 12(0.325,2.925) 13(-0.325,2.925) 14(-0.975,2.925) 15(-1.625,2.925) 16(-2.275,2.925)
  silkscreen extent -2.53,-1.95 2.54,1.95, body extent -2.55,-3.2 2.55,3.2, height 1.2
WF-2S [mm] "Connector; Header; 2 Position"
  rect 1.8x1.8 hole 1.1: 1(0,0)
  round 1.8 hole 1.1: 2(2.54,0)
  silkscreen extent -1.27,-2.54 3.81,3.18, body extent -1.2,-2.6 3.8,3.2, height 11.62
WF-4S [mm] "2.54mm 4-pin connector"
  rect 1.8x1.8 hole 1.1: 1(-3.81,0)
  round 1.8 hole 1.1: 2(-1.27,0) 3(1.27,0) 4(3.81,0)
  silkscreen extent -5.13,-2.7 5.13,3.27, body extent -5.08,-2.7 5.08,3.2, height 11.73

## Part data
C1 C2 C6A C6B C8 C11 C16 C17A C17B C19 C23 C24 C26 C28 C29 C30 C32 C35 C36 C37: library part CL10B104KB8NNND, "100nF 50V X7R ±10% 0603 Ceramic Capacitor RoHS", Dielectric Type=X7R, Manufacturer="Samsung Electro-Mechanics", Package=0603, Supplier Part Number 1=CL10B104KB8NNND-ND, Temperature Range="-55°C ~ 125°C", Tolerance=±10%, Voltage=50V, Ajax_1C_ID=21313, Ajax_1C_PN="100nF 50V X7R 10% 0603 CL10B104KB8NNND ceramic capacitor SMD", Ajax_1С_Status=Substitution, Component Status=Released, Component Type=SMD, ComponentLink1Description=Datasheet, ComponentLink1URL=https://media.digikey.com/pdf/Data%20Sheets/Samsung%20PDFs/CL_Series_MLCC_ds.pdf, GUID_1C=f1fd6399-ca68-11ea-ab63-0050569f2651, Part Number=CL10B104KB8NNND, Part Type="Ceramic / X7R / 0603", Price=0,0039378, Replacement=CL10B104KB8NNNC, Standard Lead Time="18 Weeks", Supplier 1=Digi-Key
C3A C3B C4A C4B C5A C5B C31: library part C2012JB1V226M125AC, "22uF 35V JB ±20% 0805 Ceramic Capacitor RoHS", Dielectric Type=JB, Manufacturer="TDK Corporation", Package=0805, Supplier Part Number 1=810-C2012JB1V226M12C, Temperature Range="-25°C ~ 85°C", Tolerance=±20%, Voltage=35V, Ajax_1C_ID=32073, Ajax_1C_PN="22uF 35V 20% 0805 TDK C2012JB1V226M125AC Ceramic Capacitors RoHS", Ajax_1С_Status="RND Only", Component Status=Released, Component Type=SMD, ComponentLink1Description=Datasheet, ComponentLink1URL=https://product.tdk.com/info/en/catalog/datasheets/mlcc_commercial_general_en.pdf, GUID_1C=562d6396-e930-11eb-ab74-0050569f2651, Part Number=C2012JB1V226M125AC, Part Type="Ceramic / JB / 0805", Price=0,567, Replacement=NONE, Standard Lead Time="30 Weeks", Supplier 1=Mouser
C7: library part 293D106X9010A2TE3, "10uF 10V ±10% Case A Tantalum Capacitor RoHS, 3.4Ohm", Dielectric Type=NONE, Manufacturer=Vishay, Package="Case A", Supplier Part Number 1=74-293D106X9010A2TE3, Temperature Range="-55°C ~ 125°C", Tolerance=±10%, Voltage=10V, Ajax_1C_ID=58999, Ajax_1C_PN="10uF 10V case A Vishay 293D106X9010A2TE3 Tantalum Capacitor SMD RoHS", Ajax_1С_Status="RND Only", Component Status=Released, Component Type=SMD, ComponentLink1Description=Datasheet, ComponentLink1URL=https://eu.mouser.com/datasheet/2/427/293d-1763499.pdf, GUID_1C=304cf5a9-8da3-11ed-a366-005056994834, Part Number=293D106X9010A2TE3, Part Type=Tantalum, Price=0,1, Replacement=NONE, Standard Lead Time="20 Weeks", Supplier 1=Mouser
C9 C10: library part CL05C220JB5NNNC, "22pF 50V NP0, C0G ±5% 0402 Ceramic Capacitor RoHS", Dielectric Type=C0G/NP0, Manufacturer="Samsung Electro-Mechanics", Package=0402, Supplier Part Number 1=1276-1116-2-ND, Temperature Range="-55°C ~ 125°C", Tolerance=±5%, Voltage=50V, Ajax_1C_ID=26744, Ajax_1C_PN="22pF 50V COG 5% 0402 Samsung CL05C220JB5NNNC Ceramic Capacitor SMD RoHS", Ajax_1С_Status=Substitution, Component Status=Released, Component Type=SMD, ComponentLink1Description=Datasheet, ComponentLink1URL=https://media.digikey.com/pdf/Data%20Sheets/Samsung%20PDFs/CL_Series_MLCC_ds.pdf, GUID_1C=5b73e2ce-71ce-11eb-ab70-0050569f2651, Part Number=CL05C220JB5NNNC, Part Type="Ceramic / C0G(NP0) / 0402", Price=0,0034, Replacement=NONE, Standard Lead Time="22 Weeks", Supplier 1=Digi-Key
C12 C13: library part B41858C5688M000, "6800uF 25V ±20% Aluminum Electrolytic Capacitors Radial, 5000 Hrs @ 105°C, 4467mA Ripple Current", Dielectric Type=NONE, Manufacturer="Epcos / TDK", Package=D18x40mm, Supplier Part Number 1=871-B41858C5688M, Temperature Range="-55°C ~ 105°C", Tolerance=±20%, Voltage=25V, Ajax_1C_PN=NONE, Ajax_1С_Status="RND Only", Component Status=Released, Component Type=PTH, ComponentLink1Description=Datasheet, ComponentLink1URL=https://product.tdk.com/system/files/dam/doc/product/capacitor/aluminum-electrolytic/single-ended/data_sheet/20/30/db/aec/b41858.pdf, Part Number=B41858C5688M000, Part Type=Aluminum, Price=NONE, Replacement=NONE, Standard Lead Time="36 Weeks", Supplier 1=Mouser
C14: library part Film, Manufacturer=Epcos, Package="31.5x15 mm", PartNumber=B32774D4106K000, Temperature=-40...+105°C, Tolerance=±10%, TypeCapacitor="Film capacitor", Voltage=450VDC, HelpURL=https://www.digikey.com/products/en/capacitors/film-capacitors/62?k=&pkeyword=&sv=0&pv2097=1958&sf=0&FV=fffc01ef%2C1f140000%2Cffe0003e%2Cffec6366&quantity=1&ColumnSort=1000011&page=1&stock=1&pageSize=25, Impedance=10.9mOhm, ValueManufacturerPartNumber="Film capacitor, 10μF, 450VDC, ±10%, 10.9mOhm, 31.5x15 mm, -40...+105°C"
C15: library part GRM21BR61H475KE51L, "4.7uF 50V X5R ±10% 0805 Ceramic Capacitor RoHS", Dielectric Type=X5R, Manufacturer="Murata Electronics", Package=0805, Supplier Part Number 1=490-10751-2-ND, Temperature Range="-55°C ~ 85°C", Tolerance=±10%, Voltage=50V, Ajax_1C_ID=10966, Ajax_1C_PN="4.7uF 50V X5R 10% 0805 GRM21BR61H475KE51L/CL21A475KBQNNNE Ceramic Capacitor SMD RoHS", Ajax_1С_Status="Mass Production", Component Status=Released, Component Type=SMD, ComponentLink1Description=Datasheet, ComponentLink1URL=https://search.murata.co.jp/Ceramy/image/img/A01X/G101/ENG/GRM21BR61H475KE51-01.pdf, GUID_1C=c30c0b00-b370-11e7-8189-14dda9d2d04d, Part Number=GRM21BR61H475KE51L, Part Type="Ceramic / X5R / 0805", Price=0,0396, Replacement=NONE, Standard Lead Time="15 Weeks", Supplier 1=Digi-Key
C18: library part CL21B103KBANNNC, "10nF 50V X7R ±10% 0805 Ceramic Capacitor RoHS", Dielectric Type=X7R, Manufacturer="Samsung Electro-Mechanics", Package=0805, Supplier Part Number 1=187-CL21B103KBANNNC, Temperature Range="-55°C ~ 125°C", Tolerance=±10%, Voltage=50V, Ajax_1C_PN=NONE, Ajax_1С_Status="RND Only", Component Status=Released, Component Type=SMD, ComponentLink1Description=Datasheet, ComponentLink1URL=https://eu.mouser.com/datasheet/2/585/MLCC-1837944.pdf, Part Number=CL21B103KBANNNC, Part Type="Ceramic / X7R / 0805", Price=NONE, Replacement=NONE, Standard Lead Time="26 Weeks", Supplier 1=Mouser
C20 C21 C22 C25 C27: library part TAJA106K016RNJ, "10uF 16V ±10% Case A Tantalum Capacitors, 3Ohm", Dielectric Type=NONE, Manufacturer=AVX, Package="Case A", Supplier Part Number 1=581-TAJA106K016R, Temperature Range="-55°C ~ 125°C", Tolerance=±10%, Voltage=16V, Ajax_1C_ID=6332, Ajax_1C_PN="10uF 16V case A TAJA106K016RNJ-AVX Ceramic Capacitor SMD RoHS", Ajax_1С_Status="RND Only", Component Status=Released, Component Type=SMD, ComponentLink1Description=Datasheet, ComponentLink1URL=https://eu.mouser.com/datasheet/2/40/AVXC_S_A0011957049_1-2538439.pdf, GUID_1C=b7f6d7ac-ecab-11e4-ad28-a45d36c4a9e5, Part Number=TAJA106K016RNJ, Part Type=Tantalum, Price=0,06584713, Replacement=NONE, Standard Lead Time="25 Weeks", Supplier 1=Mouser
C33: library part C2012X5R1V106K125AC, "10uF 35V X5R ±10% 0805 Low ESL Ceramic Capacitor RoHS", Dielectric Type=X5R, Manufacturer="TDK Corporation", Package=0805, Supplier Part Number 1=445-14418-2-ND, Temperature Range="-55°C ~ 85°C", Tolerance=±10%, Voltage=35V, Ajax_1C_ID=29369, Ajax_1C_PN="10uF 35V X5R 10% 0805 C2012X5R1V106K125AC TDK Ceramic Capacitor SMD RoHS", Ajax_1С_Status=Substitution, Component Status=Released, Component Type=SMD, ComponentLink1Description=Datasheet, ComponentLink1URL=https://product.tdk.com/system/files/dam/doc/product/capacitor/ceramic/mlcc/catalog/mlcc_commercial_general_en.pdf, GUID_1C=b7f6aaac-a81d-11eb-ab74-0050569f2651, Part Number=C2012X5R1V106K125AC, Part Type="Ceramic / X5R / 0805", Price=0,04568564, Replacement=NONE, Standard Lead Time="28 Weeks", Supplier 1=Digi-Key
D1A D1B: "4.35V to 18V, 2A, High Efficiency Synchronous Step Down Converter, 500kHz, SOT-23-6", Manufacturer="Diodes Incorporated", Package=SOT-23-6, Temperature Range="-40°C ~ 85°C", Ajax_1С_Status="RND Only", Component Status=Released, Component Type=SMD, ComponentLink1Description=Datasheet, Part Number=AP62300WU-7, Part Type="Power / DC-DC / Buck", Replacement=NONE
D2: "Adjustable Precision Shunt Regulator, Accuracy 1%,  SOT-23-3", Manufacturer="Texas Instruments", Package=SOT-23, Supplier Part Number 1=296-17328-1-ND, Temperature Range="0°C ~ 70°C", Ajax_1C_ID=6287, Ajax_1C_PN="TL431ACDBZR (SOT-23)", Ajax_1С_Status="Mass Production", Component Status=Released, Component Type=SMD, ComponentLink1Description=Datasheet, ComponentLink1URL=https://www.ti.com/lit/ds/symlink/tl431.pdf, GUID_1C=b426e85d-df70-11e4-9f89-a45d36c4a9e5, Part Number=TL431ACDBZR, Part Type="Voltage Reference", Price=0,0553, Replacement=NONE, Standard Lead Time="8 Weeks", Supplier 1=Digi-Key
DA1: "Differential General Purpose Comparator with Open-Collector, Open-Emitter, SOIC-8", Manufacturer="Texas Instruments", Package=SOIC-8, Supplier Part Number 1=296-1388-5-ND, Temperature Range="0°C ~ 70°C", Ajax_1C_ID=11065, Ajax_1C_PN="LM311D SO8, микросхема", Ajax_1С_Status="RND Only", Component Status="On Review", Component Type=SMD, ComponentLink1Description=Datasheet, ComponentLink1URL=https://www.ti.com/lit/ds/symlink/lm311.pdf, GUID_1C=9c0f62f0-bfd1-11e7-8199-14dda9d2d04d, Part Number=LM311D, Part Type=Comparator, Price=0,2625203, Replacement=NONE, Standard Lead Time="6 Weeks", Supplier 1=Digi-Key
DA2: "Low- and High-Side Voltage Output, 2.7V to 5.5V, Current-Sense Amplifiers, Gain 20 V/V, SOT-23-5", Manufacturer="Texas Instruments", Package=SOT-23-5, Supplier Part Number 1=296-47652-2-ND, Temperature Range="-40°C ~ 125°C", Ajax_1C_ID=25363, Ajax_1C_PN="INA180A1IDBVT TI Current Sense Amplifier, SOT-23-5", Ajax_1С_Status="RND Only", Component Status=Released, Component Type=SMD, ComponentLink1Description=Datasheet, ComponentLink1URL=https://www.ti.com/lit/ds/symlink/ina180.pdf, GUID_1C=575c0dc1-4f39-11eb-ab6e-0050569f2651, Part Number=INA180A1IDBVR, Part Type="Amplifier / Current Sense", Price=0,367, Replacement=NONE, Standard Lead Time="12 Weeks", Supplier 1=Digi-Key
DD1 DD2: "Single Power Supply Single Buffer Gate with 3-State Output CMOS Logic Level Shifter, SOT-23-5", Manufacturer="Texas Instruments", Package=SOT-23-5, Supplier Part Number 1=296-37172-2-ND, Temperature Range="-40°C ~ 125°C", Ajax_1C_ID=37412, Ajax_1C_PN="SN74LV1T125DBVRG4 микросхема SOT-23-5 TI", Ajax_1С_Status="RND Only", Component Status="On Review", Component Type=SMD, ComponentLink1Description=Datasheet, ComponentLink1URL=https://www.ti.com/lit/ds/symlink/sn74lv1t125.pdf, GUID_1C=2979ae79-574b-11ec-a356-005056994834, Part Number=SN74LV1T125DBVR, Part Type="Logic / Level Translator", Price=0,386, Replacement=NONE, Standard Lead Time="35 Weeks", Supplier 1=Digi-Key
DD3: "4-Bit 1-of-2 FET Multiplexer/Demultiplexer 2.5V/3.3V Low-Voltage High-Bandwidth Bus Switch", Manufacturer="Texas Instruments", Package=TSSOP-16, Supplier Part Number 1=296-19138-1-ND, Temperature Range="-40°C ~ 85°C", Ajax_1C_ID=9738, Ajax_1C_PN="SN74CB3Q3257PWR микросхема", Ajax_1С_Status="RND Only", Component Status=Released, Component Type=SMD, ComponentLink1Description=Datasheet, ComponentLink1URL=http://www.ti.com/lit/ds/symlink/sn74cb3q3257.pdf, GUID_1C=ccf75652-0f3c-11e7-82d9-d8cb8a9acc66, Part Number=SN74CB3Q3257PWR, Part Type="Logic / Multiplexer/Demultiplexer", Price=0,337, Replacement=NONE, Standard Lead Time="8 Weeks", Supplier 1=Digi-Key
DD4: "Single D-type Flip-Flop with Asynchronous Clear, Positive Edge Trigger, SC-70-6", Manufacturer="Texas Instruments", Package=SC-70-6, Supplier Part Number 1=296-16998-2-ND, Temperature Range="-40°C ~ 125°C", Ajax_1C_ID=25389, Ajax_1C_PN="SN74LVC1G175DCKR (SC70-6) микросхема", Ajax_1С_Status="RND Only", Component Status="On Review", Component Type=SMD, ComponentLink1Description=Datasheet, ComponentLink1URL=https://www.ti.com/lit/ds/symlink/sn74lvc1g175.pdf, GUID_1C=0fcd2c69-53fe-11eb-ab6e-0050569f2651, Part Number=SN74LVC1G175DCKR, Part Type="Logic / Flip-Flop", Price=0,0382, Replacement=NONE, Standard Lead Time="6 Weeks", Supplier 1=Digi-Key
F1: "Fuse", Manufacturer_Name=LITTELFUSE, Manufacturer_Part_Number=17861640001, Datasheet Link=https://www.littelfuse.com/media?resourcetype=2d-prints&itemid=dcb90cf3-0771-4ccd-8726-26101cf00574&filename=ol-178.6164.0000(c), Height=17.5mm
FB1: "600 Ohms @ 100MHz Power Line Ferrite Bead 0402, 200mA 650mOhm", Current=0.2A, Manufacturer="Murata Electronics", Package=0402, Saturation Current=NONE, Supplier Part Number 1=81-BLM15BD601SN1D, Temperature Range="-55°C ~ 125°C", Tolerance=±25%, Ajax_1C_ID=50383, Ajax_1C_PN="600R BLM15BD601SN1D 0402 Murata Ferrite Bead", Ajax_1С_Status="RND Only", Component Status=Released, Component Type=SMD, ComponentLink1Description=Datasheet, ComponentLink1URL=https://eu.mouser.com/datasheet/2/281/ENFA0018-1915754.pdf, GUID_1C=598dd509-398f-11ed-a363-005056994834, Part Number=BLM15BD601SN1D, Part Type="Ferrite Bead", Price=0,05, Replacement=NONE, Standard Lead Time="26 Weeks", Supplier 1=Mouser
FP1 FP2 FP3 FP4 FP5 FP6 FP7 FP8 FP9 FP10 FP11 FP12 FP13 FP14 FP15 FP16: "1.75mm Pad for Plug-In or Receptacle", Manufacturer=NONE, Ajax_1C_PN=NONE, Ajax_1С_Status="RND Only", Component Status=Released, Component Type=PTH, ComponentLink1Description=Datasheet, ComponentLink1URL=NONE, Part Number=PAD-1.75mm, Part Type=Pad, Price=NONE, Replacement=NONE, Temperature Range=NONE
HG1A HG1B: "Low Power LED, Green 565nm, Clear, SMD 0805, Vf 2.1V - 2.6V, 5 ~ 12mcd @ 20 mA, 130°", Color=Green, Manufacturer="Lite-On Optoelectronics", Package=0805, Supplier Part Number 1=160-1423-2-ND, Temperature Range="-55°C ~ 85°C", Ajax_1C_ID=30364, Ajax_1C_PN="LTST-C171GKT Green SMD LED 0805 12mcd 20mA 130deg RoHS", Ajax_1С_Status="RND Only", Component Status=Released, Component Type=SMD, ComponentLink1Description=Datasheet, ComponentLink1URL=https://media.digikey.com/pdf/Data%20Sheets/Lite-On%20PDFs/LTST-C171GKT.pdf, GUID_1C=df39881f-c399-11eb-ab74-0050569f2651, Part Number=LTST-C171GKT, Part Type="LED / 0805", Price=0,0319, Replacement=NONE, Supplier 1=Digi-Key, Wavelength=565nm
HG2: "Indication LED, Green 525nm, Clear, SMD 0603, Vf 2.5V - 3.1V, 28 ~ 280mcd @ 5 mA, 130°", Color=Green, Manufacturer="Lite-On Optoelectronics", Package=0603, Supplier Part Number 1=160-1832-2-ND, Temperature Range="-20°C ~ 80°C", Ajax_1C_ID=10369, Ajax_1C_PN="LTST-C193TGKT-5A Green SMD LED 0603 12mcd 5mA 130deg RoHS pcs", Ajax_1С_Status="Mass Production", Component Status=Released, Component Type=SMD, ComponentLink1Description=Datasheet, ComponentLink1URL=https://media.digikey.com/pdf/Data%20Sheets/Lite-On%20PDFs/LTST-C193TGKT-5A.pdf, GUID_1C=4b87c4c2-6263-11e7-811b-14dda9d2d04d, Part Number=LTST-C193TGKT-5A, Part Type="LED / 0603", Price=0,10177143, Replacement=NONE, Supplier 1=Digi-Key, Wavelength=525nm
IC1: "Integrated Circuit", Manufacturer_Name=Glenair, Datasheet Link=https://datasheetspdf.com/pdf-file/729849/EGMicro/EG8010/1, Height=1.6mm, Manufacturer_Part_Number=EG8010
IC2 IC3 IC4 IC5: "Integrated Circuit", Arrow Part Number=TLP250(F), Manufacturer_Name=Toshiba, Mouser Part Number=757-TLP250(F), Arrow Price/Stock=https://www.arrow.com/en/products/tlp250-f/toshiba, Datasheet Link=https://pdf.voron.ua/files/pdf/optopara/tlp250.pdf, Height=4.85mm, Manufacturer_Part_Number=TLP250(F), Mouser Price/Stock=https://www.mouser.co.uk/ProductDetail/Toshiba/TLP250F?qs=f0GatGUIxV2cDxQrFeprhQ%3D%3D
K1A K1B K2: "Miniature High Power Relay, DPDT (2 Form C), 12VDC 400mW Coil, 5.0mm 2 Pole 8A AgCdO", Manufacturer=Hongfa, Temperature Range="-40°C ~ 85°C", Ajax_1C_ID=38428, Ajax_1C_PN="HF115F/012-2ZS4 HONGFA, Реле", Ajax_1С_Status="RND Only", Component Status=Released, Component Type=PTH, ComponentLink1Description=Datasheet, ComponentLink1URL=https://www.tme.eu/Document/2962d862af219292e2e76bbc4b5ef3a2/hf115f.pdf, GUID_1C=4ba44618-64be-11ec-a90c-00505699469b, Part Number=HF115F/012-2ZS4, Part Type=Relay, Price=2,02140634, Replacement=NONE, Supplier 1=TME, Supplier Part Number 1=HF115F/012-2ZS4
L1A L1B: library part SRN4018-4R7M, "4.7uH Semi-Shielded Wirewound Inductor 1.9A 84mOhm Max", Current=1.9A, Manufacturer="Bourns Inc", Package=4.0x4.0x1.8mm, Saturation Current=2A, Supplier Part Number 1=652-SRN4018-4R7M, Temperature Range="-25°C ~ 120°C", Tolerance=±20%, Ajax_1C_ID=20972, Ajax_1C_PN="4.7uH SRN4018-4R7M SMD Индуктивность", Ajax_1С_Status="RND Only", Component Status=Released, Component Type=SMD, ComponentLink1Description=Datasheet, ComponentLink1URL=https://eu.mouser.com/datasheet/2/54/srn4018-1391320.pdf, GUID_1C=7ba8f5fd-b629-11ea-ab61-0050569f2651, Part Number=SRN4018-4R7M, Part Type="Power / Ferrite Core", Price=0,291, Replacement=NONE, Standard Lead Time="42 Weeks", Supplier 1=Mouser
R1 R3 R6A R6B R58 R61: library part RC0805FR-0710K2L, "10 kOhms ±1%, 1/8W 0805 Thick Film Resistor", Manufacturer=Yageo, Package=0805, Power Rating=0.125W, Supplier Part Number 1=311-10.2KCRTR-ND, Temperature Range="-55°C ~ 155°C", Temperature Stability=±100ppm/°C, Tolerance=±1%, Voltage=150V, Ajax_1C_ID=13943, Ajax_1C_PN="10.2k 1% 0805 Resistors SMD RoHS", Ajax_1С_Status="Mass Production", Component Status=Released, Component Type=SMD, ComponentLink1Description=Datasheet, ComponentLink1URL=https://eu.mouser.com/datasheet/2/447/PYu_RC_Group_51_RoHS_L_10-1664068.pdf, GUID_1C=8bc9d0ce-c58a-11e8-ab47-0050569f2651, Part Number=RC0805FR-0710K2L, Part Type="Thick Film", Price=0,0014, Replacement=NONE, Supplier 1=Digi-Key
R2: library part RC0805JR-072K2L, "2.2 kOhms ±5% 1/8W 0805 Thick Film Resistor", Manufacturer=Yageo, Package=0805, Power Rating=0.125W, Supplier Part Number 1=311-2.2KARTR-ND, Temperature Range="-55°C ~ 155°C", Temperature Stability=±100ppm/°C, Tolerance=±5%, Voltage=150V, Ajax_1C_ID=26119, Ajax_1C_PN="2.2k 5% 0805 Resistors SMD RoHS", Ajax_1С_Status="RND Only", Component Status=Released, Component Type=SMD, ComponentLink1Description=Datasheet, ComponentLink1URL=https://eu.mouser.com/datasheet/2/447/PYu_RC_Group_51_RoHS_L_11-1984063.pdf, GUID_1C=80325ec8-617a-11eb-ab6f-0050569f2651, Part Number=RC0805JR-072K2L, Part Type="Thick Film", Price=0,005, Replacement=NONE, Supplier 1=Digi-Key